# Allegro board SOLOMIPI-CON-20231116-2020(1).brd
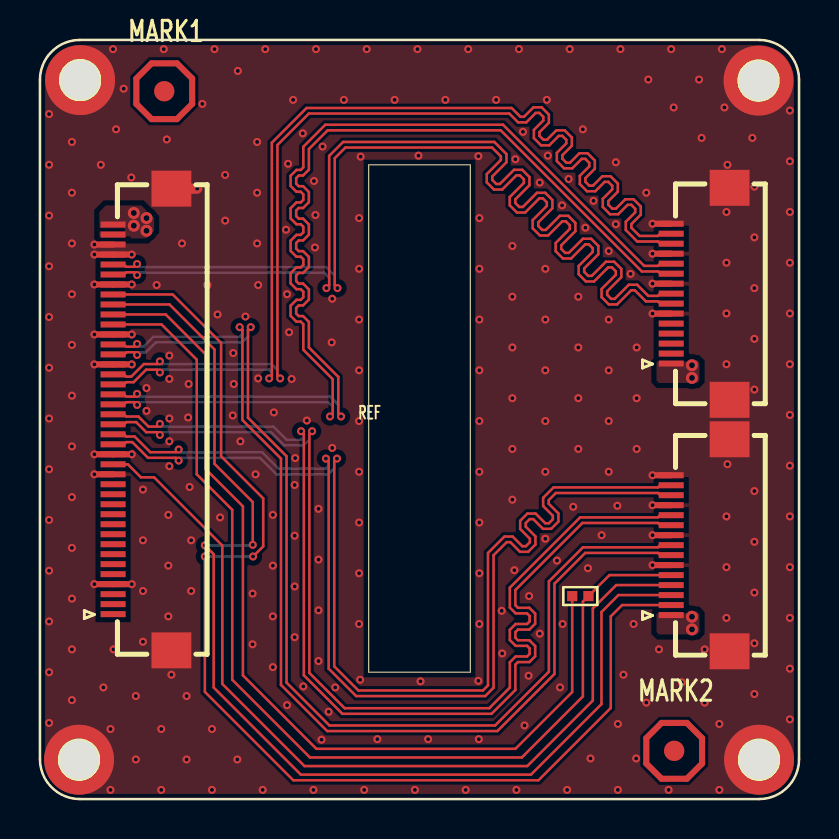
[diagram p0: board, top side]
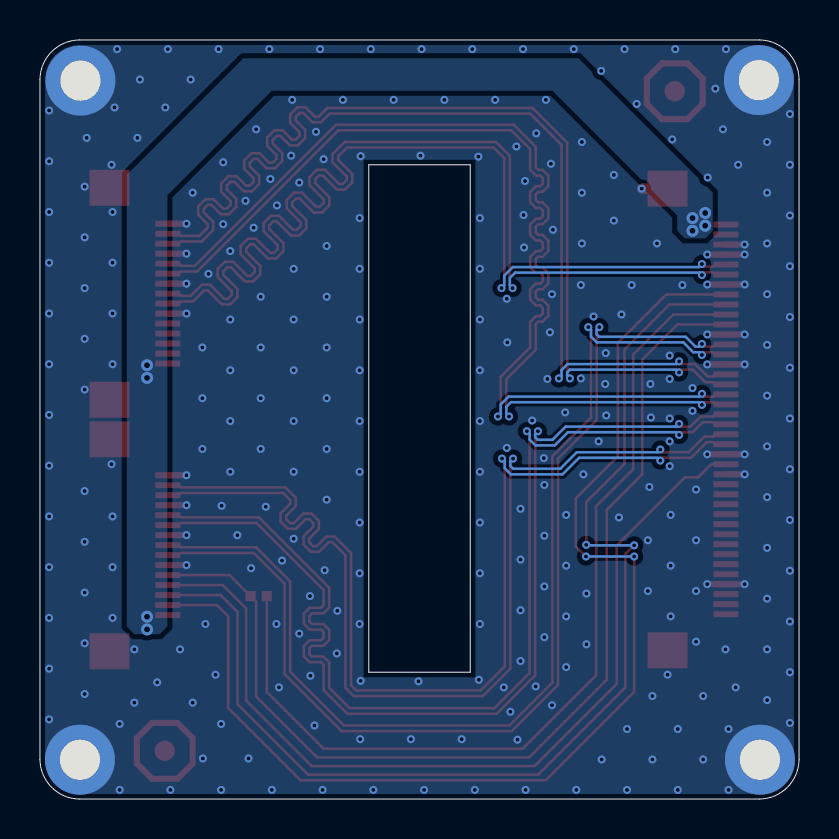
[diagram p1: board, bottom side, seen from below]

Outline 38 x 38 mm; copper layers: TOP, BOTTOM. Coordinates in mm from the lower left corner of the outline.
Outline path: 0,36 arc(0.59,37.41) 2,38 36,38 arc(37.41,37.41) 38,36 38,2 arc(37.41,0.59) 36,0 2,0 arc(0.59,0.59) 0,2 0,36 ; 16.46,31.75 16.46,6.35 21.54,6.35 21.54,31.75 16.46,31.75

## Design rules (mm)
net group SINGLE-S12: nets MIPI/LVDS_MCLK0 MIPI/LVDS_RST0

## Placement (name value [footprint] x y rotation side)
H1  HOLE_C2R00  [HOLE_C2R00_C3R50]  35.97 35.96 0 top
H2  HOLE_C2R00  [HOLE_C2R00_C3R50]  1.96 1.97 0 top
H3  HOLE_C2R00  [HOLE_C2R00_C3R50]  2.01 35.99 0 top
H4  HOLE_C2R00  [HOLE_C2R00_C3R50]  36 1.97 0 top
J1  FPC05015--03XXX  [FPC_0M5_15_OS]  33.06 12.7 90 top
J2  -  [FPC_0M5_40_OS]  5.12 19 90 top
J3  FPC05015--03XXX  [FPC_0M5_15_OS]  33.06 25.29 90 top
MARK1  FID_MARK_PASTE  [MARK1_0]  6.22 35.43 0 top
MARK2  FID_MARK_PASTE  [MARK1_0]  31.75 2.41 0 top
R49  0R/NC  [SR0402]  27.05 10.16 0 top
REF  -  []  18.41 19.05 0 top

## Library data of the parts
H1-H4 = HOLE
J1 J3 = FPC05015--03XXX_0
J2 = 40pin_0
MARK1 MARK2 = h0502
R49 = RES

## Footprints (pads in the part's own frame, mm; a bottom-side part is the same pattern mirrored in y, then rotated)
FPC_0M5_15_OS
  rect 0.3x1.25 smd: 1(-3.493,1.46) 2(-2.992,1.46) 3(-2.492,1.46) 4(-1.991,1.46) 5(-1.491,1.46) 6(-0.991,1.46) 7(-0.49,1.46) 8(0.008,1.46) 9(0.508,1.46) 10(1.008,1.46) 11(1.509,1.46) 12(2.009,1.46) 13(2.51,1.46) 14(3.007,1.46) 15(3.508,1.46)
  rect 1.801x1.999 smd: 16(-5.306,-1.46) 17(5.306,-1.46)
FPC_0M5_40_OS
  rect 0.3x1.25 smd: 1(-9.743,1.46) 2(-9.243,1.46) 3(-8.743,1.46) 4(-8.242,1.46) 5(-7.742,1.46) 6(-7.242,1.46) 7(-6.741,1.46) 8(-6.243,1.46) 9(-5.743,1.46) 10(-5.243,1.46) 11(-4.742,1.46) 12(-4.242,1.46) 13(-3.741,1.46) 14(-3.241,1.46) 15(-2.743,1.46) 16(-2.243,1.46) 17(-1.742,1.46) 18(-1.242,1.46) 19(-0.742,1.46) 20(-0.241,1.46) 21(0.259,1.46) 22(0.757,1.46) 23(1.257,1.46) 24(1.758,1.46) 25(2.258,1.46) 26(2.758,1.46) 27(3.259,1.46) 28(3.757,1.46) 29(4.257,1.46) 30(4.757,1.46) 31(5.258,1.46) 32(5.758,1.46) 33(6.259,1.46) 34(6.759,1.46) 35(7.257,1.46) 36(7.757,1.46) 37(8.258,1.46) 38(8.758,1.46) 39(9.258,1.46) 40(9.759,1.46)
  rect 1.801x1.999 smd: 41(11.557,-1.46) 42(-11.557,-1.46)
HOLE_C2R00_C3R50
  round 3.5 hole 1.999: 1(0,0)
MARK1_0
  round 1.016 smd: 1(0,0)
SR0402
  rect 0.508x0.508 smd: 1(0.406,0) 2(-0.406,0)

## Nets
GND: H1.1 H2.1 H3.1 H4.1 J1.6 J1.9 J1.12 J1.15 J1.16 J1.17 J2.4 J2.15 J2.17 J2.26 J2.29 J2.34 J2.37 J2.38 J2.41 J2.42 J3.6 J3.9 J3.12 J3.15 J3.16 J3.17
VCC_3V3: J1.1 J2.39 J2.40 J3.1
MIPI/LVDS_CLK0N: J1.8 J2.27
MIPI/LVDS_CLK0P: J1.7 J2.28
MIPI/LVDS_CLK1N: J2.35 J3.8
MIPI/LVDS_CLK1P: J2.36 J3.7
MIPI/LVDS_D0N: J1.14 J2.18
MIPI/LVDS_D0P: J1.13 J2.19
MIPI/LVDS_D1N: J1.11 J2.20
MIPI/LVDS_D1P: J1.10 J2.21
MIPI/LVDS_D2N: J2.24 J3.14
MIPI/LVDS_D2P: J2.25 J3.13
MIPI/LVDS_D3N: J2.22 J3.11
MIPI/LVDS_D3P: J2.23 J3.10
MIPI/LVDS_MCLK0: J1.4 J2.16
MIPI/LVDS_RST0: J1.5 J2.30 R49.1
MIPI_I2C4_SCL: J1.3 J2.32
MIPI_I2C4_SDA: J1.2 J2.33
MIPI_RX0_PDN: J2.31 R49.2

Pads without a net: J2 1 2 3 5 6 7 8 9 10 11 12 13 14; J3 2 3 4 5; MARK1 1; MARK2 1

## Via types
v1: diameter 0.401, hole 0.201, TOP to BOTTOM, 325 vias
v2: diameter 0.6, hole 0.3, TOP to BOTTOM, 8 vias

## Routing (per net, layer and track width the routed paths; a pad name or vN(x,y) marks a point on that pad's centre or on a via; arc(x,y) is an arc through that point)
GND: length 21.9
  TOP w0.305: J3.9 v1(30.66,25.8) ; v1(4.6,21.76) J2.26 v1(2.72,21.76) ; J1.6 v1(30.66,11.71) ; J3.12 v1(30.66,27.3) ; v1(4.6,23.26) J2.29 v1(2.72,23.26) ; v1(2.72,27.26) J2.37 v1(4.6,27.26) ; v1(4.6,25.76) J2.34 v1(2.72,25.76) ; v1(4.6,17.26) J2.17 v1(2.72,17.26) ; J2.38 v1(2.72,27.76) ; v1(2.72,10.76) J2.4 v1(4.6,10.76) ; J3.15 v1(30.66,28.8) ; J1.15 v1(30.66,16.21) ; J1.9 v1(30.66,13.21) ; J2.15 v1(2.72,16.26) ; J1.12 v1(30.66,14.71) ; J3.6 v1(30.66,24.3)
  TOP w0.508: J2.41 v1(7.87,30.56)
  vias: v1(0.46,34.29) v1(0.46,31.75) v1(0.46,29.21) v1(0.46,26.67) v1(0.46,24.13) v1(0.46,21.59) v1(0.46,19.05) v1(0.46,16.51) v1(0.46,13.97) v1(0.46,11.43) v1(0.46,8.89) v1(0.46,6.35) v1(0.46,3.81) v1(1.6,32.89) v1(1.6,30.35) v1(1.6,27.81) v1(1.6,25.27) v1(1.6,22.73) v1(1.6,20.19) v1(1.6,17.65) v1(1.6,15.11) v1(1.6,12.57) v1(1.6,10.03) v1(1.6,7.49) v1(1.6,4.95) v1(3.05,31.75) v1(3.17,5.59) v1(3.53,3.51) v1(3.53,0.46) v1(3.66,37.54) v1(3.68,7.49) v1(3.81,33.53) v1(4.19,35.56) v1(4.57,31.11) v1(4.8,5.16) v1(4.8,1.98) v1(5.16,15.49) v1(5.16,12.95) v1(5.16,10.41) v1(5.16,7.87) v1(5.33,20.57) v1(5.33,19.43) v1(5.84,25.73) v1(6.07,3.51) v1(6.07,0.46) v1(6.2,37.54) v1(6.35,33.02) v1(6.43,14.22) v1(6.43,11.68) v1(6.43,9.14) v1(6.48,22.2) v1(6.48,21.03) v1(6.48,19.05) v1(6.48,17.91) v1(6.48,16.66) v1(6.58,6.22) v1(7.11,27.81) v1(7.34,5.16) v1(7.34,1.98) v1(7.44,20.78) v1(7.42,19.1) v1(7.49,15.62) v1(7.57,12.95) v1(7.57,10.41) v1(8.13,34.8) v1(8.38,25.73) v1(8.61,3.51) v1(8.61,0.46) v1(8.74,37.54) v1(8.89,24.26) v1(9.02,14.1) v1(9.27,31.24) v1(9.27,28.96) v1(9.65,19.2) v1(9.68,22.33) v1(9.7,20.78) v1(9.91,36.45) v1(9.88,1.98) v1(10.03,17.91) v1(10.29,24.16) v1(10.64,10.29) v1(10.64,7.75) v1(10.79,16.26) v1(10.87,32.89) v1(10.87,30.35) v1(10.87,27.81) v1(10.92,25.73) v1(10.92,21.06) v1(11.15,0.46) v1(11.28,37.54) v1(11.66,14.22) v1(11.66,11.68) v1(11.66,9.14) v1(11.66,6.6) v1(11.71,19.35) v1(12.32,28.5) v1(12.42,31.8) v1(12.37,25.27) v1(12.37,4.7) v1(12.47,23.37) v1(12.6,21.03) v1(12.67,35) v1(12.75,15.72) v1(12.75,13.18) v1(12.75,10.64) v1(12.75,8.1) v1(12.78,17.07) v1(13.16,33.32) v1(13.18,5.64) v1(13.36,18.95) v1(13.72,30.94) v1(13.77,27.61) v1(13.69,0.46) v1(13.82,37.54) v1(13.79,29.24) v1(13.94,14.53) v1(13.94,11.99) v1(13.94,9.45) v1(13.94,6.91) v1(14.15,32.66) v1(14.1,2.97) v1(14.45,4.37) v1(14.63,25.04) v1(14.61,22.86) v1(14.63,17.58) v1(14.78,5.59) v1(15.21,35) v1(16.05,32.16) v1(15.98,29.08) v1(15.98,26.54) v1(15.98,24) v1(15.98,21.46) v1(15.98,18.92) v1(15.98,16.38) v1(15.98,13.84) v1(15.98,11.3) v1(15.98,8.76) v1(16.03,5.97) v1(16.23,0.46) v1(16.36,37.54) v1(16.89,3) v1(17.75,35) v1(18.77,0.46) v1(18.9,37.54) v1(18.95,32.21) v1(19.05,5.89) v1(19.43,3) v1(20.29,35) v1(21.31,0.46) v1(21.44,37.54) v1(21.95,32.18) v1(21.95,5.92) v1(22,29.08) v1(22,26.54) v1(22,24) v1(22,21.46) v1(22,18.92) v1(22,16.38) v1(22,13.84) v1(22,11.3) v1(22,8.76) v1(21.97,3) v1(22.83,35) v1(23.11,9.42) v1(23.14,7.29) v1(23.65,27.69) v1(23.65,25.15) v1(23.65,22.61) v1(23.65,20.07) v1(23.65,17.53) v1(23.65,14.99) v1(23.75,11.46) v1(23.8,32.03) v1(23.85,0.46) v1(23.98,37.54) v1(24.18,33.4) v1(24.26,3.68) v1(24.46,6.17) v1(24.49,10.16) v1(25.02,30.86) v1(25.02,8.28) v1(25.3,26.54) v1(25.3,24) v1(25.3,21.46) v1(25.3,18.92) v1(25.3,16.38) v1(25.3,13.03) v1(25.37,35) v1(25.43,32.21) v1(25.88,11.94) v1(26.04,5.59) v1(26.14,29.72) v1(26.16,8.76) v1(26.47,31.04) v1(26.39,0.46) v1(26.52,37.54) v1(26.7,14.63) v1(26.95,25.15) v1(26.95,22.61) v1(26.95,20.07) v1(26.95,17.53) v1(27.18,33.53) v1(27.3,28.6) v1(27.43,11.56) v1(27.56,2.03) v1(27.71,29.95) v1(28.12,13.21) v1(28.47,27.43) v1(28.47,24) v1(28.47,21.46) v1(28.47,18.92) v1(28.47,16.38) v1(28.83,31.88) v1(28.83,28.78) v1(28.91,14.68) v1(28.93,3.76) v1(28.93,0.46) v1(29.06,37.54) v1(29.21,6.22) v1(29.57,26.29) v1(29.72,8.76) v1(29.84,2.03) v1(29.87,22.61) v1(29.87,20.07) v1(29.87,17.53) v1(30.35,30.35) v1(30.35,4.83) v1(30.45,36.02) v1(30.99,7.49) v1(31.47,0.46) v1(31.6,37.54) v1(31.72,34.62) v1(32.13,5.84) v1(32.99,36.02) v1(33.12,33.1) v1(33.27,7.49) v1(33.27,4.83) v1(34.01,3.76) v1(34.01,0.46) v1(34.14,37.54) v1(34.26,34.62) v1(34.37,29.39) v1(34.37,26.85) v1(34.37,24.31) v1(34.37,21.77) v1(34.37,14.15) v1(34.37,11.61) v1(34.37,9.07) v1(34.42,31.75) v1(34.42,16.76) v1(35.66,33.1) v1(35.76,30.66) v1(35.76,28.12) v1(35.76,25.58) v1(35.76,23.04) v1(35.76,20.5) v1(35.76,15.42) v1(35.76,12.88) v1(35.76,10.34) v1(35.76,7.8) v1(35.76,5.26) v1(37.54,34.47) v1(37.54,31.93) v1(37.54,29.39) v1(37.54,26.85) v1(37.54,24.31) v1(37.54,21.77) v1(37.54,19.23) v1(37.54,16.69) v1(37.54,14.15) v1(37.54,11.61) v1(37.54,9.07) v1(37.54,6.53) v1(37.54,3.99)
VCC_3V3:
  vias: v2(4.7,29.34) v2(4.7,28.7) v2(5.33,29.08) v2(5.33,28.45) v2(32.64,21.72) v2(32.64,21.08) v2(32.64,9.13) v2(32.64,8.49)
MIPI/LVDS_CLK0N: length 52.9
  TOP w0.127: v1(4.86,22.23) 4.72,22.37 4.33,22.37 4.23,22.26 J2.27 ; v1(10.55,23.62) 10.41,23.49 10.41,19.09 12.34,17.16 12.34,5.83 14.49,3.68 22.78,3.68 25.48,6.38 25.48,10.9 27.18,12.6 30.93,12.6 31.04,12.71 J1.8
  BOTTOM w0.127: v1(10.55,23.62) 10.41,23.49 10.41,23.15 10.12,22.86 5.79,22.86 5.3,22.37 5,22.37 v1(4.86,22.23)
MIPI/LVDS_CLK0P: length 52.9
  TOP w0.127: J1.7 31.05,12.21 30.94,12.32 27.3,12.32 25.76,10.78 25.76,6.26 22.9,3.4 14.38,3.4 12.06,5.71 12.06,17.04 10.13,18.97 10.13,23.49 v1(10,23.62) ; J2.28 4.21,22.76 4.32,22.65 4.72,22.65 v1(4.86,22.78)
  BOTTOM w0.127: v1(10,23.62) 10.13,23.49 10.13,23.27 10.01,23.14 5.68,23.14 5.18,22.65 5,22.65 v1(4.86,22.78)
MIPI/LVDS_CLK1N: length 53.1
  TOP w0.127: J2.35 4.21,26.26 4.32,26.37 4.72,26.37 v1(4.86,26.23) ; J3.8 31.04,25.3 30.93,25.19 30.45,25.19 29.89,25.75 29.48,25.75 28.77,25.04 28.59,25.04 28.4,25.24 28.4,25.42 29.1,26.13 29.1,26.54 28.74,26.9 28.33,26.9 27.62,26.19 27.44,26.19 27.25,26.39 27.25,26.57 27.95,27.28 27.95,27.69 27.59,28.05 27.18,28.05 26.47,27.34 26.29,27.34 26.1,27.54 26.1,27.72 26.8,28.43 26.8,28.84 26.44,29.2 26.03,29.2 25.32,28.49 25.14,28.49 24.95,28.69 24.95,28.87 25.65,29.58 25.65,29.99 25.29,30.35 24.88,30.35 24.17,29.64 23.99,29.64 23.79,29.84 23.79,30.02 24.5,30.73 24.5,31.14 24.14,31.5 23.73,31.5 23.02,30.79 22.84,30.79 22.64,30.99 22.64,31.17 23.35,31.88 23.35,32.29 22.75,32.89 15.17,32.89 14.48,32.2 14.48,25.71 v1(14.34,25.58)
  BOTTOM w0.127: v1(4.86,26.23) 4.98,26.35 14.21,26.35 14.48,26.09 14.48,25.71 v1(14.34,25.58)
MIPI/LVDS_CLK1P: length 53.1
  TOP w0.127: v1(14.89,25.58) 14.76,25.71 14.76,32.08 15.29,32.61 22.63,32.61 23.07,32.17 23.07,31.99 22.37,31.28 22.37,30.87 22.73,30.51 23.14,30.51 23.85,31.22 24.03,31.22 24.22,31.02 24.22,30.84 23.52,30.13 23.52,29.72 23.88,29.36 24.29,29.36 25,30.07 25.18,30.07 25.37,29.87 25.37,29.69 24.67,28.98 24.67,28.57 25.03,28.21 25.44,28.21 26.15,28.92 26.33,28.92 26.52,28.72 26.52,28.54 25.82,27.83 25.82,27.42 26.18,27.06 26.59,27.06 27.3,27.77 27.48,27.77 27.67,27.57 27.67,27.39 26.97,26.68 26.97,26.27 27.33,25.91 27.74,25.91 28.45,26.62 28.63,26.62 28.82,26.42 28.82,26.24 28.12,25.53 28.12,25.12 28.48,24.76 28.89,24.76 29.6,25.47 29.78,25.47 30.33,24.91 30.94,24.91 31.05,24.8 J3.7 ; J2.36 4.21,26.76 4.32,26.65 4.72,26.65 v1(4.86,26.78)
  BOTTOM w0.127: v1(4.86,26.78) 5.01,26.63 14.33,26.63 14.76,26.2 14.76,25.71 v1(14.89,25.58)
MIPI/LVDS_D0N: length 52
  TOP w0.127: v1(6.94,16.94) 6.81,17.08 5.41,17.08 4.62,17.87 4.32,17.87 4.21,17.76 J2.18 ; J1.14 31.04,15.71 30.93,15.6 25.71,15.6 25.19,15.08 25.19,14.67 25.67,14.18 25.67,14 25.48,13.81 25.3,13.81 24.81,14.29 24.4,14.29 24.04,13.93 24.04,13.52 24.52,13.03 24.52,12.85 24.33,12.66 24.15,12.66 23.66,13.14 23.25,13.14 22.43,12.32 22.43,5.69 22.17,5.44 15.94,5.44 14.73,6.64 14.73,16.91 v1(14.87,17.04)
  BOTTOM w0.127: v1(14.87,17.04) 14.73,16.91 14.73,16.56 14.43,16.26 11.84,16.26 11.01,17.08 7.08,17.08 v1(6.94,16.94)
MIPI/LVDS_D0P: length 52
  TOP w0.127: J2.19 4.21,18.26 4.32,18.15 4.74,18.15 5.52,17.36 6.81,17.36 v1(6.94,17.5) ; J1.13 31.05,15.21 30.94,15.32 25.82,15.32 25.47,14.96 25.47,14.78 25.95,14.3 25.95,13.89 25.59,13.53 25.18,13.53 24.7,14.01 24.52,14.01 24.32,13.81 24.32,13.63 24.8,13.15 24.8,12.74 24.44,12.38 24.03,12.38 23.55,12.86 23.37,12.86 22.71,12.2 22.71,5.57 22.29,5.16 15.82,5.16 14.45,6.53 14.45,16.91 v1(14.32,17.04)
  BOTTOM w0.127: v1(6.94,17.5) 7.08,17.36 11.13,17.36 11.95,16.54 14.31,16.54 14.45,16.67 14.45,16.91 v1(14.32,17.04)
MIPI/LVDS_D1N: length 52
  TOP w0.127: J2.20 4.21,18.76 4.32,18.87 4.81,18.87 5.32,18.36 5.87,18.36 v1(6,18.23) ; J1.11 31.04,14.21 30.93,14.1 27.04,14.1 23.52,10.58 23.52,9.59 23.81,9.3 24.38,9.3 24.51,9.17 24.51,8.89 24.38,8.76 23.81,8.76 23.52,8.47 23.52,7.96 23.81,7.67 24.38,7.67 24.51,7.54 24.51,7.26 24.38,7.14 23.81,7.14 23.52,6.85 23.52,5.58 22.49,4.55 15.25,4.55 13.49,6.31 13.49,18.28 v1(13.62,18.41)
  BOTTOM w0.127: v1(6,18.23) 6.14,18.36 11.57,18.36 12.23,17.7 13.2,17.7 13.49,17.99 13.49,18.28 v1(13.62,18.41)
MIPI/LVDS_D1P: length 52
  TOP w0.127: J1.10 31.05,13.71 30.94,13.82 27.16,13.82 23.8,10.46 23.8,9.7 23.93,9.57 24.5,9.57 24.79,9.28 24.79,8.77 24.5,8.48 23.93,8.48 23.8,8.36 23.8,8.08 23.93,7.95 24.5,7.95 24.79,7.66 24.79,7.15 24.5,6.86 23.93,6.86 23.8,6.73 23.8,5.46 22.61,4.27 15.14,4.27 13.21,6.2 13.21,18.28 v1(13.07,18.41) ; J2.21 4.21,19.26 4.32,19.15 4.93,19.15 5.44,18.64 5.87,18.64 v1(6,18.78)
  BOTTOM w0.127: v1(6,18.78) 6.14,18.64 11.68,18.64 12.34,17.98 13.08,17.98 13.21,18.11 13.21,18.28 v1(13.07,18.41)
MIPI/LVDS_D2N: length 52.5
  TOP w0.127: J3.14 31.04,28.3 30.93,28.19 30.02,28.19 29.6,28.6 29.6,28.78 30.08,29.25 30.08,29.66 29.71,30.03 29.3,30.03 28.83,29.55 28.65,29.55 28.45,29.75 28.45,29.93 28.93,30.4 28.93,30.81 28.56,31.18 28.15,31.18 27.68,30.7 27.5,30.7 27.3,30.9 27.3,31.08 27.78,31.55 27.78,31.96 27.41,32.33 27,32.33 26.53,31.85 26.35,31.85 26.15,32.05 26.15,32.23 26.63,32.7 26.63,33.11 26.26,33.48 25.85,33.48 25.38,33 25.2,33 25,33.2 25,33.38 25.48,33.85 25.48,34.26 25.11,34.63 24.7,34.63 24.23,34.15 24.05,34.15 23.61,34.59 13.35,34.59 11.61,32.86 11.61,21.19 v1(11.47,21.06) ; v1(6,21.36) 5.87,21.49 5.31,21.49 4.69,20.87 4.32,20.87 4.21,20.76 J2.24
  BOTTOM w0.127: v1(6,21.36) 6.14,21.49 11.47,21.49 11.61,21.36 11.61,21.19 v1(11.47,21.06)
MIPI/LVDS_D2P: length 52.5
  TOP w0.127: J2.25 4.21,21.26 4.32,21.15 4.57,21.15 5.2,21.77 5.87,21.77 v1(6,21.91) ; J3.13 31.05,27.8 30.94,27.91 29.9,27.91 29.33,28.49 29.33,28.9 29.8,29.37 29.8,29.55 29.6,29.75 29.42,29.75 28.95,29.27 28.54,29.27 28.17,29.64 28.17,30.05 28.65,30.52 28.65,30.7 28.45,30.9 28.27,30.9 27.8,30.42 27.39,30.42 27.02,30.79 27.02,31.2 27.5,31.67 27.5,31.85 27.3,32.05 27.12,32.05 26.65,31.57 26.24,31.57 25.87,31.94 25.87,32.35 26.35,32.82 26.35,33 26.15,33.2 25.97,33.2 25.5,32.72 25.09,32.72 24.72,33.09 24.72,33.5 25.2,33.97 25.2,34.15 25,34.35 24.82,34.35 24.35,33.87 23.94,33.87 23.5,34.32 13.46,34.32 11.89,32.74 11.89,21.19 v1(12.02,21.06)
  BOTTOM w0.127: v1(6,21.91) 6.14,21.77 11.59,21.77 11.89,21.48 11.89,21.19 v1(12.02,21.06)
MIPI/LVDS_D3N: length 51.7
  TOP w0.127: J3.11 31.04,26.8 30.93,26.69 30.25,26.69 23.18,33.76 14.29,33.76 13.18,32.65 13.18,31.62 13.06,31.49 12.84,31.49 12.55,31.2 12.55,30.69 12.84,30.4 13.06,30.4 13.18,30.27 13.18,29.99 13.06,29.87 12.84,29.87 12.55,29.58 12.55,29.07 12.84,28.77 13.06,28.77 13.18,28.65 13.18,28.37 13.06,28.24 12.84,28.24 12.55,27.95 12.55,27.44 12.84,27.15 13.06,27.15 13.18,27.02 13.18,26.74 13.06,26.62 12.84,26.62 12.55,26.33 12.55,25.81 12.84,25.52 13.06,25.52 13.18,25.4 13.18,25.12 13.06,24.99 12.84,24.99 12.55,24.7 12.55,24.19 12.84,23.9 13.06,23.9 13.18,23.77 13.18,22.49 14.66,21.02 14.66,19.29 v1(14.52,19.15) ; J2.22 4.21,19.76 4.32,19.87 4.72,19.87 v1(4.86,19.73)
  BOTTOM w0.127: v1(14.52,19.15) 14.66,19.29 14.66,19.63 14.42,19.87 5,19.87 v1(4.86,19.73)
MIPI/LVDS_D3P: length 51.7
  TOP w0.127: v1(15.07,19.15) 14.94,19.29 14.94,21.13 13.46,22.61 13.46,23.89 13.17,24.18 12.95,24.18 12.83,24.3 12.83,24.58 12.95,24.71 13.17,24.71 13.46,25 13.46,25.51 13.17,25.8 12.95,25.8 12.83,25.93 12.83,26.21 12.95,26.34 13.17,26.34 13.46,26.63 13.46,27.14 13.17,27.43 12.95,27.43 12.83,27.56 12.83,27.83 12.95,27.96 13.17,27.96 13.46,28.25 13.46,28.76 13.17,29.05 12.95,29.05 12.83,29.18 12.83,29.46 12.95,29.59 13.17,29.59 13.46,29.88 13.46,30.39 13.17,30.68 12.95,30.68 12.83,30.81 12.83,31.09 12.95,31.21 13.17,31.21 13.46,31.5 13.46,32.54 14.4,33.48 23.06,33.48 30.13,26.41 30.94,26.41 31.05,26.3 J3.10 ; J2.23 4.21,20.26 4.32,20.15 4.72,20.15 v1(4.86,20.28)
  BOTTOM w0.127: v1(4.86,20.28) 5,20.15 14.54,20.15 14.94,19.75 14.94,19.29 v1(15.07,19.15)
MIPI/LVDS_MCLK0: length 44.7
  TOP w0.127: J1.4 28.85,10.71 27.68,9.54 27.68,4.93 24.4,1.65 13.24,1.65 9.13,5.76 9.13,12.69 5.71,16.1 5.05,16.1 4.4,16.76 J2.16
MIPI/LVDS_RST0: length 51.8
  TOP w0.127: J2.30 6.09,23.76 7.85,22 7.85,16.26 9.63,14.48 9.63,5.97 13.51,2.08 24.12,2.08 27.18,5.14 27.18,9.88 R49.1 28.51,11.21 J1.5
MIPI_I2C4_SCL: length 57.4
  TOP w0.127: J1.3 28.96,10.21 28.11,9.36 28.11,4.75 24.58,1.22 13.06,1.22 8.7,5.58 8.7,12.26 v1(8.25,12.7) ; J2.32 6.48,24.76 8.74,22.5 8.74,16.78 10.65,14.87 v1(10.65,12.73)
  BOTTOM w0.127: v1(10.65,12.73) 10.63,12.7 v1(8.25,12.7)
MIPI_I2C4_SDA: length 58.9
  TOP w0.127: J1.2 29.14,9.71 28.57,9.14 28.57,4.56 24.96,0.94 12.68,0.94 8.25,5.37 v1(8.25,12.14) ; v1(10.67,12.14) 11.18,12.65 11.18,15.05 9.07,17.16 9.07,22.83 6.64,25.26 J2.33
  BOTTOM w0.127: v1(10.67,12.14) v1(8.25,12.14)
MIPI_RX0_PDN: length 46.3
  TOP w0.127: R49.2 26.64,5.36 23.8,2.51 13.84,2.51 10.16,6.19 10.16,14.65 8.31,16.51 8.31,22.25 6.3,24.26 J2.31

## Copper pours and planes (outline as drawn; the poured copper is in the pictures)
GND on TOP: 2,0.25 0.77,0.77 0.25,2 0.25,36 0.77,37.23 2,37.75 36,37.75 37.23,37.23 37.75,36 37.75,2 37.23,0.77 36,0.25 ; 2 cut-outs
GND on BOTTOM: 2,0.25 0.77,0.77 0.25,2 0.25,36 0.77,37.23 2,37.75 36,37.75 37.23,37.23 37.75,36 37.75,2 37.23,0.77 36,0.25
VCC_3V3 on TOP: 2.97,28.14 3.05,28.07 5.33,28.07 5.71,28.45 5.71,29.08 5.08,29.72 3.3,29.72 2.97,29.39 2.97,28.63 3.02,28.57 4.22,28.57 4.27,28.52 4.27,28.47 4.22,28.42 3.02,28.42 2.97,28.37
VCC_3V3 on TOP: 30.99,9.38 32.89,9.38 33.02,9.25 33.02,8.36 32.89,8.24 30.99,8.24 30.86,8.36 30.86,9.25
VCC_3V3 on TOP: 30.99,21.97 32.89,21.97 33.02,21.84 33.02,20.95 32.89,20.83 30.99,20.83 30.86,20.95 30.86,21.84
VCC_3V3 on BOTTOM: 4.32,28.45 4.7,28.07 5.71,28.07 6.1,28.45 6.1,29.21 12.34,35.46 26.39,35.46 31.62,30.23 31.62,8.64 32,8.26 33.27,8.26 33.66,8.64 33.66,31.24 27.81,37.08 11.05,37.08 4.32,30.35
